# Altium PCB DAP-PCB-REV-3.2.PcbDoc (part 5 of 5)
Units mm, origin at the board's own origin, x right, y up, seen from the top; angles counter-clockwise.
Board outline 54.75 x 54.75 mm, 6 copper layers (L1 (SIG/PWR), L2 (GND), L3 (SIG), L4 (PWR), L5 (GND), L6 (SIG/PWR)), stack 1.65 mm thick; 308 components, 179 nets, 954 pads, 440 vias.
Unrouted connection lines stored in the file: 7.
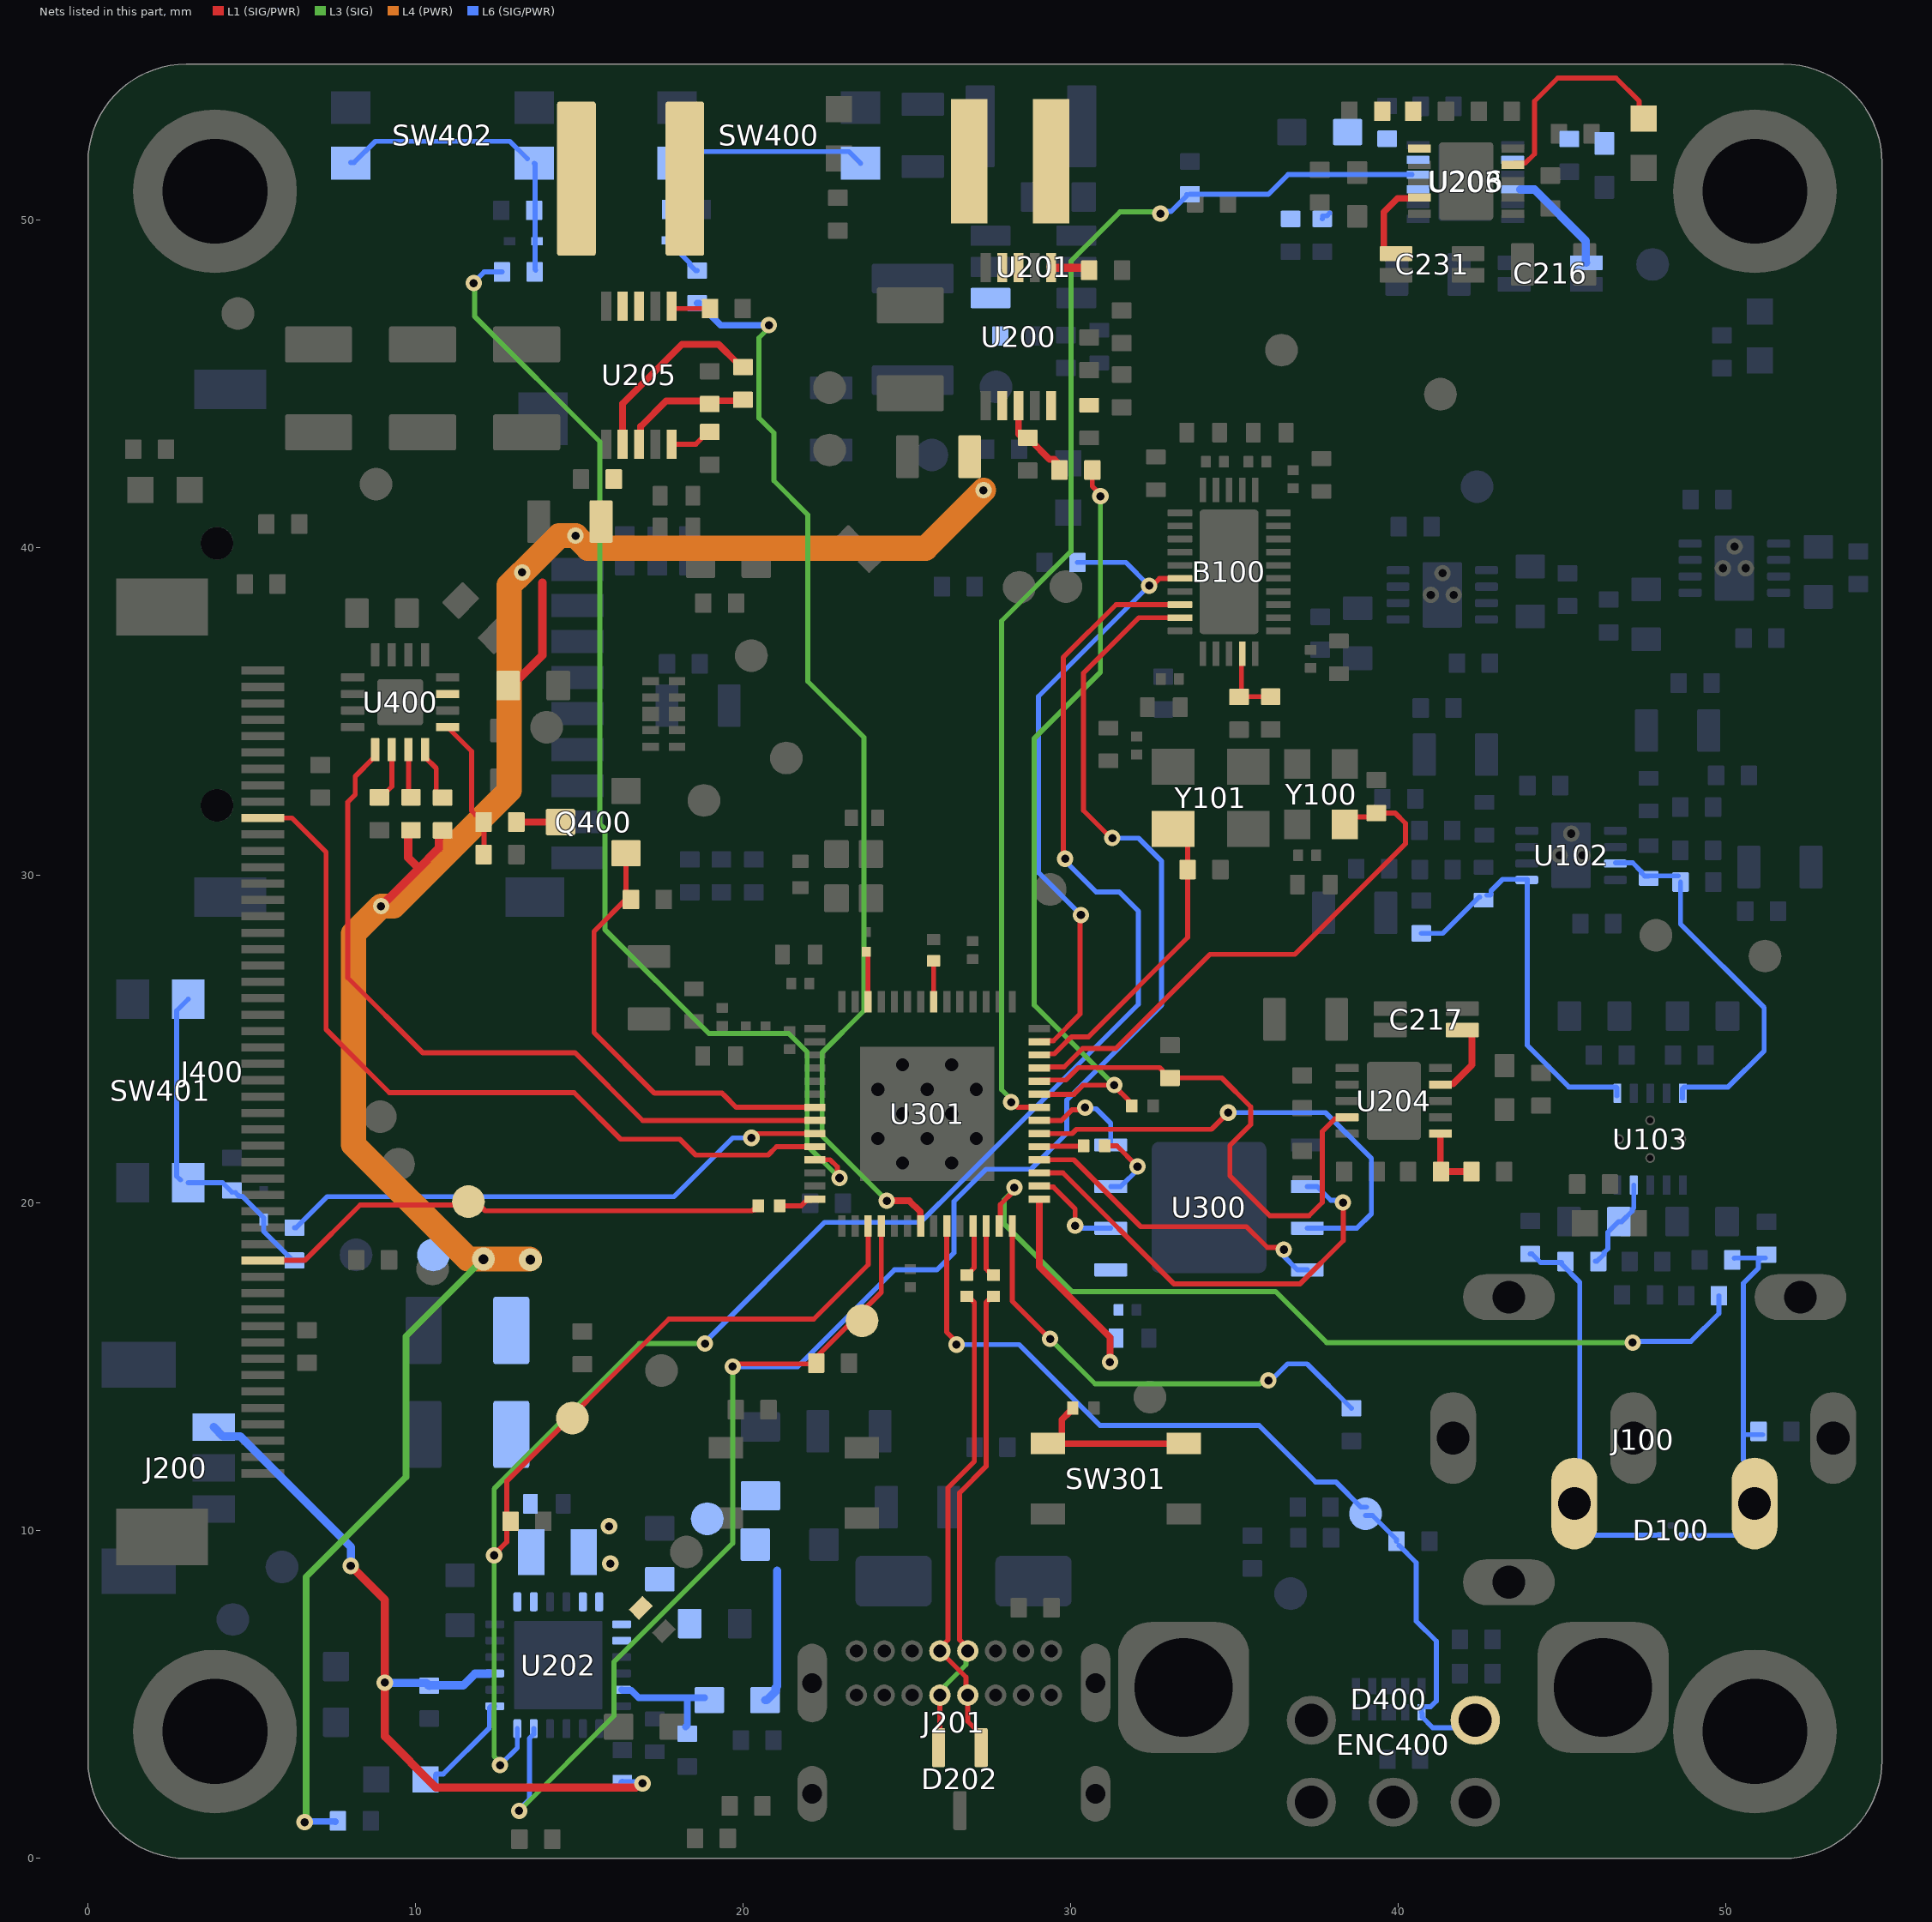
[diagram p7: the nets of this part, all layers, seen from the top]

## Via types
v1: diameter 0.5, hole 0.25, L1 (SIG/PWR) to L6 (SIG/PWR), tented both sides, 357 vias
v2: diameter 0.7, hole 0.35, L1 (SIG/PWR) to L6 (SIG/PWR), tented both sides, 69 vias
v3: diameter 1.25, hole 0.75, L1 (SIG/PWR) to L6 (SIG/PWR), 6 vias
v4: diameter 0.4/0.4/0.4/0.4/0.4/0.4 (per signal layer), hole 0.2, L1 (SIG/PWR) to L6 (SIG/PWR), tented both sides, 5 vias
v5: diameter 0.7, hole 0.3, L1 (SIG/PWR) to L6 (SIG/PWR), tented both sides, 3 vias

## Nets (pads, with @x,y where several pads share a name; then routed paths per layer and width w, separated by ;. In a path a pad name is that pad's centre, name@x,y a point inside that pad or via, vN(x,y) a via of type N, cw(c..) or ccw(c..) an arc to the next point about the centre after c; other vN are vias at no path point) (continued)
NetQ400_1: Q400.1 R425.2 U301.7 | length 13.7
  L1 (SIG/PWR) w0.152: Q400.1@16.422,30.677 16.422,29.416 R425.2@16.573,29.265 ; R425.2@16.496,29.341 15.447,28.292 15.447,25.201 17.295,23.353 19.353,23.353 19.409,23.296 19.784,22.922 22.146,22.922 U301.7@22.153,22.915
NetQ400_3: Q400.3 R423.1 | length 1.5
  L1 (SIG/PWR) w0.203: R423.1@13.052,31.627 14.177,31.627 Q400.3@14.431,31.881
NetR119_1: R119.1 U301.28 | length 14.5
  L1 (SIG/PWR) w0.152: U301.28@28.213,19.297 28.213,17.006 v1(29.366,15.854)
  L3 (SIG) w0.152: v1(29.366,15.854) 30.738,14.482 35.766,14.482 35.804,14.52 35.963,14.52 v1(36.029,14.587)
  L6 (SIG/PWR) w0.152: v1(36.029,14.587) 36.109,14.587 36.614,15.092 37.207,15.092 R119.1@38.561,13.737
NetR128_1: R128.1 U301.27 | length 26.8
  L1 (SIG/PWR) w0.152: U301.27@27.813,19.297 27.847,19.33 27.847,19.955 28.274,20.382 v1(28.274,20.476)
  L3 (SIG) w0.152: v1(28.274,20.476) 28.274,20.413 27.968,20.106 27.968,19.361 30.027,17.301 36.25,17.301 37.808,15.743 v1(47.145,15.743)
  L6 (SIG/PWR) w0.152: v1@47.146,15.777 48.924,15.777 49.78,16.633 R128.1@49.78,17.174
NetR203_1: R203.1 R303.2 U301.37 | length 23.6
  L1 (SIG/PWR) w0.152: U301.37@29.038,23.322 30.094,23.322 30.373,23.601 v1(31.322,23.601) 31.322,23.575 R303.2@31.805,23.093 ; R203.1@30.654,42.371 30.654,41.871 v1@30.814,41.711
  L3 (SIG) w0.152: v1(30.902,41.569) 30.902,36.201 28.884,34.183 28.884,26.039 31.246,23.677 v1@31.271,23.677
NetR204_1: R204.1 U201.4
NetR207_2: R207.2 U200.1 | length 1.3
  L1 (SIG/PWR) w0.254: U200.1@29.401,48.542 30.636,48.542 R207.2@30.636,48.493
NetR219_1: R219.1 R226.2 U203.3 | length 0.3
  L6 (SIG/PWR) w0.152: R219.1@37.672,50.034 R219.1@37.672,50.042 ; R219.1@37.678,50.124 37.812,50.124 R219.1@37.896,50.208
NetR238_1: R238.1 U205.10 | length 1.3
  L1 (SIG/PWR) w0.152: U205.10@17.819,43.16 18.556,43.16 18.91,43.514 R238.1@19.003,43.514
NetR239_2: R239.2 U205.1 | length 1.2
  L1 (SIG/PWR) w0.152: U205.1@17.819,47.374 17.894,47.299 18.978,47.299 R239.2@19.003,47.324
NetR302_2: R302.2 SW301.1 SW301.2 | length 5.6
  L1 (SIG/PWR) w0.203: R302.2@30.052,13.72 30.052,13.715 29.984,13.647 29.979,13.647 29.721,13.389 29.721,12.885 29.498,12.661 SW301.1@29.298,12.661 33.413,12.661 SW301.2@33.43,12.679
NetR304_1: R304.1 U301.25 | length 1.6
  L1 (SIG/PWR) w0.153: R304.1@26.826,17.804 26.851,17.804 26.95,17.903 26.95,17.928 27.049,18.027 27.049,19.046 27.013,19.082 U301.25@27.013,19.297
NetR305_1: R305.1 U301.26 | length 1.6
  L1 (SIG/PWR) w0.153: U301.26@27.413,19.297 27.413,17.992 27.503,17.903 27.54,17.903 R305.1@27.639,17.804
NetR306_1: R306.1 U301.14 | length 1.1
  L1 (SIG/PWR) w0.152: R306.1@21.111,19.918 21.769,19.918 21.94,20.088 22.069,20.088 U301.14@22.102,20.121
NetR409_1: R409.1 U301.9 | length 17
  L1 (SIG/PWR) w0.152: v1@20.304,22.122 U301.9@22.188,22.122
  L6 (SIG/PWR) w0.152: R409.1@6.303,19.249 6.353,19.249 7.301,20.197 17.886,20.197 19.678,21.99 v1(20.25,21.99)
NetR410_1: R410.1 U301.21 | length 33.6
  L1 (SIG/PWR) w0.203: v1@24.383,20.07 25.07,20.07 25.405,19.735 25.405,19.305 U301.21@25.413,19.297
  L3 (SIG) w0.152: v1(20.781,46.791) 20.781,46.706 20.476,46.401 20.476,43.959 20.934,43.501 20.934,42.041 21.972,41.003 21.972,35.923 23.685,34.21 23.685,25.869 22.407,24.591 22.407,22.047 v1(24.383,20.071)
  L6 (SIG/PWR) w0.203: R410.1@18.597,47.459 18.647,47.459 19.315,46.791 v1(20.781,46.791)
NetR411_1: R411.1 U301.11 | length 35.6
  L1 (SIG/PWR) w0.152: U301.11@22.188,21.322 22.654,21.322 22.872,21.103 22.872,20.832 v1(22.939,20.766)
  L3 (SIG) w0.152: v1@11.739,48.112 11.799,48.052 11.799,47.061 15.625,43.235 15.625,31.576 15.777,31.424 15.777,28.35 18.952,25.175 21.389,25.175 21.95,24.615 21.95,21.755 v1(22.939,20.766)
  L6 (SIG/PWR) w0.152: v1@11.739,48.061 12.094,48.416 R411.1@12.636,48.416
  other v1: 11.773,48.073
NetR420_2: R420.2 U400.3 | length 1.6
  L1 (SIG/PWR) w0.152: U400.3@9.783,33.837 9.783,32.44 R420.2@9.91,32.313
NetR421_2: R421.2 U400.4 | length 1.7
  L1 (SIG/PWR) w0.152: U400.4@10.291,33.837 10.291,33.606 10.631,33.267 10.631,32.481 R421.2@10.774,32.338
NetR422_2: R422.2 U400.2 | length 1.6
  L1 (SIG/PWR) w0.152: R422.2@8.945,32.414 8.977,32.414 9.275,32.712 U400.2@9.275,33.837
NetR423_2: R423.2 R424.2 U400.5 | length 4.4
  L1 (SIG/PWR) w0.152: U400.5@10.977,34.523 11.713,33.786 11.713,31.965 11.828,31.851 11.878,31.851 12.052,31.677 R423.2@12.052,31.627 ; R424.2@12.094,30.611 R423.2@12.094,31.627
NetU301_8: U301.8 U400.1 | length 23.1
  L1 (SIG/PWR) w0.152: U400.1@8.716,33.583 8.157,33.024 8.157,32.465 7.929,32.237 7.929,26.877 10.215,24.591 14.863,24.591 16.932,22.522 U301.8@22.188,22.522
OUTS_1: C216.4 U203.10 | length 3.3
  L6 (SIG/PWR) w0.254: U203.10@43.717,50.931 44.149,50.931 45.715,49.365 45.715,48.712 C216.4@45.732,48.696
OUTS_2: C231.4 U206.9 | length 2.4
  L1 (SIG/PWR) w0.203: C231.4@39.552,49.102 39.552,50.245 39.968,50.661 40.618,50.661 U206.9@40.641,50.685
OUTS_3: C217.4 U204.9 | length 2.5
  L1 (SIG/PWR) w0.203: U204.9@41.282,23.618 41.305,23.641 41.666,23.641 42.244,24.219 42.244,25.077 42.121,25.201 C217.4@41.896,25.201
PG_DAC_LDO+: D204.C U206.4 | length 6.8
  L1 (SIG/PWR) w0.152: U206.4@43.491,51.685 43.54,51.734 43.866,51.734 44.149,52.017 44.149,53.623 44.86,54.335 46.638,54.335 47.344,53.629 47.344,53.096 D204.C@47.375,53.065
PG_LDO+: R223.1 U204.4 U301.38 | length 16.1
  L1 (SIG/PWR) w0.152: U301.38@29.038,23.722 29.072,23.755 29.851,23.755 30.23,24.134 32.71,24.134 32.8,24.044 32.8,23.994 32.974,23.82 34.608,23.82 35.488,22.94 35.488,22.394 34.853,21.759 34.853,20.832 36.072,19.613 37.266,19.613 37.672,20.019 37.672,22.184 38.057,22.569 38.383,22.569 U204.4@38.432,22.618
PG_LDO-: R241.1 U203.4 U301.36 | length 39
  L1 (SIG/PWR) w0.152: v1@28.198,23.093 28.369,22.922 U301.36@29.038,22.922
  L3 (SIG) w0.152: v1(28.176,23.08) 28.176,23.174 27.887,23.462 27.887,37.767 30.001,39.882 30.001,48.747 31.5,50.245 v1@32.694,50.245
  L6 (SIG/PWR) w0.152: v1(32.733,50.195) 32.799,50.262 33.059,50.262 33.532,50.735 R241.1@33.532,50.779 ; R241.1@33.634,50.787 36.029,50.787 36.631,51.388 U203.4@40.415,51.388
PGFB_DAC_LDO+: R243.1 R245.2 U206.6 | length 0
  L1 (SIG/PWR) w0.203: R243.1@39.552,53.293 R243.1@39.577,53.319
PGFB_LDO+: R222.1 R228.2 U204.6 | length 2
  L1 (SIG/PWR) w0.203: R228.2@41.282,20.995 U204.6@41.282,22.118 ; R228.2@41.296,20.959 R222.1@42.211,20.959
PGFB_LDO-: R220.1 R224.2 U203.5
PMID_BQ: C200.2 U202.20
POWER_SW: D402.C R401.2 R409.2 SW401.1 SW401.3 | length 10.1
  L6 (SIG/PWR) w0.152: SW401.3@2.823,20.705 2.71,20.819 2.71,25.869 SW401.1@3.064,26.223 ; SW401.3@3.064,20.623 4.108,20.623 R401.2@4.398,20.333 ; R401.2@4.5,20.324 4.615,20.209 4.707,20.209 5.363,19.553 5.363,19.139 6.253,18.249 R409.2@6.303,18.249
RESET: J400.10 U301.10 | length 23.9
  L1 (SIG/PWR) w0.152: J400.10@5.795,31.754 6.227,31.754 7.268,30.713 7.268,25.302 9.199,23.372 14.838,23.372 16.26,21.95 18.068,21.95 18.55,21.467 20.763,21.467 21.018,21.722 U301.10@22.188,21.722
RESETB_DAC: B100.21 R111.2 U301.41 | length 20.1
  L1 (SIG/PWR) w0.152: U301.41@29.038,24.922 29.072,24.955 29.467,24.955 30.281,25.77 v1@30.281,28.757 ; v1(32.389,38.841) 32.483,38.841 32.705,39.063 B100.21@33.329,39.063
  L6 (SIG/PWR) w0.152: R111.2@30.197,39.552 31.678,39.552 v1@32.364,38.866 ; v1(30.306,28.791) 29.011,30.087 29.011,35.462 v1@32.414,38.866
RIGHT_EAR: C124.1 R125.1 U103.9 | length 2.9
  L6 (SIG/PWR) w0.152: R125.1@46.009,18.226 46.057,18.226 46.271,18.44 46.271,18.487 46.391,18.607 46.391,19.111 46.714,19.435 46.814,19.435 47.138,19.759 47.138,19.809 47.181,19.852 U103.9@47.181,20.55
RING: D100.3 J100.3 R117.2 R125.2 | length 11.9
  L6 (SIG/PWR) w0.152: R117.2@44.022,18.452 44.072,18.452 44.334,18.19 R125.2@44.974,18.19 ; R125.2@44.974,18.14 45.533,17.582 J100.3@45.533,10.723 ; J100.3@45.431,10.824 J100.3@45.533,10.723 ; D100.3@47.975,9.862 46.031,9.862 45.533,10.36 J100.3@45.533,10.723
SCL_BQ: B100.23 R208.1 TP200.1 U202.6 U301.17 | length 69.1
  L1 (SIG/PWR) w0.152: v1(12.399,9.25) 12.399,9.272 12.78,9.653 12.78,10.291 12.78,11.51 17.733,16.463 22.153,16.463 23.813,18.124 U301.17@23.813,19.297 ; v1(29.824,30.509) 29.773,30.56 29.773,36.656 31.379,38.263 B100.23@33.329,38.263
  L3 (SIG) w0.152: v1(12.577,2.849) 12.577,2.934 12.399,3.112 12.399,11.282 16.831,15.714 18.736,15.714 v1@18.851,15.828
  L6 (SIG/PWR) w0.152: v1(12.577,2.849) 13.105,3.377 U202.6@13.105,3.962 ; v1@18.876,15.803 22.483,19.41 25.406,19.41 26.614,20.618 32.059,26.063 32.059,28.909 31.475,29.493 30.771,29.493 29.824,30.441 v1(29.824,30.509)
  other v1: 18.831,15.714
SCL_LCD: J400.37 R306.2 TP405.1 | length 16
  L1 (SIG/PWR) w0.152: J400.37@5.338,18.25 6.617,18.25 8.31,19.943 TP405.1@11.612,19.943 ; TP405.1@11.612,20.045 11.663,19.994 11.892,19.994 12.121,19.765 20.273,19.765 20.302,19.794 20.363,19.794 20.461,19.893 R306.2@20.461,19.918
SDA_BQ: B100.24 R211.1 TP202.1 U202.5 U301.18 | length 61
  L1 (SIG/PWR) w0.152: v1@19.664,15.092 22.026,15.092 24.213,17.279 U301.18@24.213,19.297 ; v1@31.221,31.144 30.382,31.983 30.382,36.174 32.072,37.863 B100.24@33.329,37.863
  L3 (SIG) w0.152: v1(13.161,1.452) 16.057,4.347 16.057,5.998 19.679,9.62 19.679,15.132 v1@19.714,15.168
  L6 (SIG/PWR) w0.152: v1(13.161,1.452) 13.161,1.493 13.479,1.811 13.479,3.666 13.605,3.792 U202.5@13.605,3.962 ; v1(19.679,15.01) 21.664,15.01 24.617,17.962 25.912,17.962 26.432,18.482 26.432,20.051 27.416,21.035 28.782,21.035 29.874,22.127 29.874,23.143 32.77,26.039 32.77,30.433 32.065,31.139 v1(31.267,31.139)
SELECT: D400.1 ENC400.5 R412.2 TP402.1 U301.23 | length 27.4
  L1 (SIG/PWR) w0.152: U301.23@26.213,19.297 26.213,16.064 26.508,15.77 v1(26.508,15.681)
  L6 (SIG/PWR) w0.152: v1(26.508,15.681) 28.421,15.681 30.89,13.212 35.742,13.212 37.462,11.492 38.085,11.492 38.854,10.723 TP402.1@39.018,10.723 ; TP402.1@38.993,10.469 39.203,10.469 39.941,9.731 R412.2@39.941,9.681 ; R412.2@40.018,9.554 40.542,9.03 40.542,7.243 41.152,6.633 41.152,4.805 40.977,4.629 40.753,4.629 40.704,4.58 D400.1@40.704,4.455 ; D400.1@40.72,4.424 40.72,4.314 41.043,3.992 42.113,3.992 ENC400.5@42.342,4.22
SET_LDO-: C222.2 R232.2 U203.8
SHDN_BB_3.3: C230.2 R237.2 U205.8 | length 4
  L1 (SIG/PWR) w0.203: U205.8@16.819,43.16 16.87,43.211 16.87,43.703 17.646,44.479 C230.2@19.105,44.479 ; C230.2@19.105,44.487 19.95,44.487 R237.2@19.968,44.505
SHDN_BB_3.9: C213.2 R203.2 U200.8 | length 2.4
  L1 (SIG/PWR) w0.203: U200.8@28.401,44.328 28.401,43.471 28.561,43.311 C213.2@28.681,43.311 ; C213.2@28.681,43.279 28.768,43.279 29.35,42.697 29.498,42.697 R203.2@29.595,42.6
SPI_CS0: U300.1 U301.32 | length 9.7
  L1 (SIG/PWR) w0.152: U301.32@29.038,21.322 30.09,21.322 32.129,19.283 35.361,19.283 35.996,18.647 36.432,18.647 v1(36.499,18.58)
  L6 (SIG/PWR) w0.152: v1@36.478,18.546 36.478,18.401 36.918,17.962 U300.1@37.218,17.962
SPI_D: U300.5 U301.35 | length 3.2
  L1 (SIG/PWR) w0.152: U301.35@29.038,22.522 29.71,22.522 30.036,22.848 30.367,22.848 v1(30.434,22.914)
  L6 (SIG/PWR) w0.152: v1(30.434,22.914) 30.468,22.88 30.772,22.88 31.218,22.435 U300.5@31.218,21.772
SPI_HD: U300.7 U301.30 | length 3
  L1 (SIG/PWR) w0.152: U301.30@29.038,20.522 29.072,20.488 29.467,20.488 30.129,19.826 30.129,19.359 v1@30.103,19.333
  L6 (SIG/PWR) w0.152: v1@30.128,19.283 30.179,19.232 U300.7@31.218,19.232
  other v1: 30.129,19.312
SPI_Q: U300.2 U301.34 | length 14.9
  L1 (SIG/PWR) w0.152: U301.34@29.038,22.122 30.041,22.122 30.169,22.249 34.289,22.249 v1@34.853,22.813
  L6 (SIG/PWR) w0.152: v1@34.802,22.788 34.827,22.762 37.774,22.762 39.171,21.365 39.171,19.675 38.728,19.232 U300.2@37.218,19.232
  other v1: 34.802,22.762
SPI_WP: U300.3 U301.31 | length 13.7
  L1 (SIG/PWR) w0.152: U301.31@29.038,20.922 29.759,20.922 33.151,17.53 36.986,17.53 38.313,18.857 38.313,20.013 v1(38.307,20.019)
  L6 (SIG/PWR) w0.152: U300.3@37.218,20.502 37.518,20.502 37.934,20.086 38.241,20.086 v1(38.307,20.019)
SPICLK: R308.2 U301.33 | length 1.4
  L1 (SIG/PWR) w0.152: U301.33@29.038,21.722 29.051,21.734 30.421,21.734 R308.2@30.433,21.746
SPICLK_FL: R308.1 U300.6 | length 2.3
  L1 (SIG/PWR) w0.152: R308.1@31.038,21.746 31.403,21.746 32.008,21.142 v1@32.008,21.137
  L6 (SIG/PWR) w0.152: U300.6@31.218,20.502 31.518,20.502 v1@32.059,21.043
  other v1: 32.034,21.116
STAT_BQ: D200.C U202.7 | length 3.3
  L6 (SIG/PWR) w0.152: D200.C@10.603,2.334 10.603,2.55 10.628,2.575 10.844,2.575 12.254,3.986 12.254,4.603 12.298,4.647 U202.7@12.42,4.647
SUMM_L: C123.1 R115.2 U102.7 U103.5 | length 11.6
  L6 (SIG/PWR) w0.152: U102.7@46.627,30.382 47.148,30.382 47.411,30.119 47.411,30.082 47.517,29.976 C123.1@47.629,29.976 ; C123.1@47.635,29.983 R115.2@48.537,29.983 ; R115.2@48.608,29.798 48.608,28.516 51.16,25.964 51.16,24.642 50.061,23.544 48.725,23.544 48.67,23.489 U103.5@48.67,23.194
SUMM_R: C118.1 R114.2 U102.1 U103.1 | length 12.3
  L6 (SIG/PWR) w0.152: R114.2@40.695,28.231 41.351,28.231 42.461,29.341 C118.1@42.473,29.341 ; C118.1@42.693,29.399 42.801,29.399 42.824,29.421 42.824,29.529 43.177,29.882 43.927,29.882 43.927,24.814 45.197,23.544 46.637,23.544 46.664,23.517 U103.1@46.664,23.27
SW1_BB_3.3: L204.1 U205.3
SW1_BB_3.9: L200.1 U200.3
SW2_BB_3.3: L204.2 U205.4
SW2_BB_3.9: L200.2 U200.4
SW_BQ: C207.1 L203.1 U202.17 U202.18
  other v1: 15.944,8.996 15.904,10.139
SYS: C203.2 C208.2 C209.2 C210.2 C224.2 C234.2 C412.2 L203.2 R206.2 R237.1 R420.1 R421.1 TP204.1 U200.7 U202.13 U202.14 U205.7 U400.7 | length 76.5
  L1 (SIG/PWR) w0.203: U205.7@16.319,43.16 16.319,44.398 18.128,46.207 19.25,46.207 19.809,45.648 R237.1@20.045,45.648
  L1 (SIG/PWR) w0.254: v1(8.945,29.062) 10.05,30.167 ; R420.1@9.91,31.348 9.865,31.348 9.775,31.258 9.775,30.543 10.05,30.268 10.05,30.167 ; R421.1@10.824,31.373 10.708,31.256 10.708,30.825 10.05,30.167 ; C412.2@12.844,35.743 13.116,36.015 13.167,36.015 13.872,36.72 13.872,38.934
  L3 (SIG) w0.203: v1(6.614,1.107) 6.656,1.149 6.656,8.587 9.707,11.637 9.707,15.93 11.942,18.165 v5@11.942,18.292
  L4 (PWR) w0.762: v1(13.252,39.246) 12.856,38.85 12.856,32.592 9.326,29.062 v1(8.945,29.062) 8.107,28.223 8.107,21.783 11.597,18.292 v5(12.069,18.292) v5@13.482,18.292 ; v1@13.262,39.246 14.38,40.365 v1(14.883,40.365) 15.264,39.984 25.563,39.984 v1(27.332,41.753)
  L6 (SIG/PWR) w0.203: v1(6.614,1.107) 6.634,1.127 7.543,1.127 R206.2@7.548,1.122
  other v5: 13.503,18.27
TIP: D100.2 J100.2 R127.2 R129.2 R134.2 | length 12.7
  L6 (SIG/PWR) w0.152: D100.2@48.651,9.859 50.328,9.859 50.931,10.462 50.931,10.824 J100.2@51.075,10.968 ; R127.2@50.249,18.317 50.257,18.325 50.987,18.325 51.197,18.325 51.059,18.325 50.987,18.253 50.987,18.017 50.525,17.555 50.525,12.882 ; J100.2@51.033,11.652 50.525,12.16 50.525,12.882 ; J100.2@51.075,10.821 J100.2@51.075,10.968 ; J100.2@51.075,11.652 J100.2@51.075,10.968 ; R129.2@51.117,12.933 50.575,12.933 50.525,12.882
TRI_STATE_22: R106.2 U301.39 Y100.1 | length 16.5
  L1 (SIG/PWR) w0.152: U301.39@29.038,24.122 29.072,24.155 29.794,24.155 30.357,24.718 31.373,24.718 34.243,27.588 36.834,27.588 40.212,30.967 40.212,31.589 39.894,31.906 R106.2@39.552,31.906 ; Y100.1@38.36,31.551 38.597,31.788 39.204,31.788 R106.2@39.323,31.906
TRI_STATE_24: R107.2 U301.40 Y101.1 | length 9.3
  L1 (SIG/PWR) w0.152: U301.40@29.038,24.522 29.072,24.555 29.496,24.555 30.014,25.074 30.535,25.074 33.565,28.104 33.565,29.959 R107.2@33.684,30.078 ; Y101.1@33.118,31.414 33.565,30.967 R107.2@33.565,30.298
TS: J200.3 R214.1 R215.2 U202.9 | length 24.4
  L1 (SIG/PWR) w0.254: v1(8.02,8.93) 9.061,7.888 9.061,5.399 v1@9.072,5.389 ; v1(9.061,5.366) 9.061,3.723 10.621,2.163 16.732,2.163 16.858,2.289 v1(16.924,2.289)
  L6 (SIG/PWR) w0.254: J200.3@3.841,13.167 4.127,12.881 4.653,12.881 8.03,9.504 v1@8.03,8.97 ; v1@9.072,5.355 10.334,5.355 R215.2@10.418,5.271 ; R215.2@10.385,5.287 11.459,5.287 11.812,5.64 U202.9@12.257,5.64 ; R214.1@16.311,2.306 16.319,2.297 16.916,2.297 v1(16.924,2.289)
U0TXD: R307.1 U301.49 | length 1.2
  L1 (SIG/PWR) w0.152: R307.1@25.81,27.334 25.812,27.333 25.812,26.148 U301.49@25.813,26.147
USB_D_N: D202.1 J201.A7 J201.B7 R304.2 | length 14.4
  L1 (SIG/PWR) w0.153: R304.2@26.826,17.154 26.925,17.056 26.965,17.056 27.055,16.966 27.055,12.115 26.251,11.311 26.251,6.67 26.004,6.423 J201.A7@26.004,6.332 26.8,5.536 26.8,5.154 J201.B7@26.924,5.029 ; J201.B7@26.854,4.982 26.854,4.186 27.178,3.862 D202.1@27.178,3.785
USB_D_P: D202.2 J201.A6 J201.B6 R305.2 | length 14.4
  L1 (SIG/PWR) w0.153: D202.2@25.875,3.789 25.891,3.789 26.004,3.901 J201.B6@26.004,4.982 ; J201.A6@26.854,6.332 26.854,6.423 26.607,6.67 26.607,11.163 27.411,11.967 27.411,16.966 27.5,17.056 27.541,17.056 R305.2@27.639,17.154
  L3 (SIG) w0.153: J201.B6@26.004,4.982 26.004,5.055 26.16,5.212 26.16,5.27 26.802,5.911 26.802,6.279 J201.A6@26.873,6.35
VC_BB_3.9: C212.2 U200.10
VDD_SPI: C311.2 C312.2 U300.8 U301.29 | length 5.9
  L1 (SIG/PWR) w0.203: U301.29@29.038,20.122 29.038,18.061 31.196,15.904 v1(31.196,15.147)
VDPM_BQ: R202.1 R205.2 U202.23 | length 3.5
  L6 (SIG/PWR) w0.203: U202.23@16.29,5.147 16.308,5.128 16.585,5.128 16.808,4.906 18.292,4.906 R202.1@18.825,4.906 ; R205.2@18.241,4.017 18.292,4.068 18.292,4.838
VOLUME+_SW: D403.C R404.2 R410.2 SW400.1 SW400.3 | length 9.2
  L6 (SIG/PWR) w0.152: D403.C@17.714,49.342 18.373,48.683 18.373,48.633 18.547,48.459 R410.2@18.597,48.459 ; 17.767,49.512 R404.2@17.767,50.321 ; R404.2@17.809,50.347 17.809,51.56 SW400.3@17.981,51.732 ; SW400.3@18.063,52.074 18.075,52.086 23.227,52.086 SW400.1@23.581,51.732
VOLUME-_SW: D404.C R406.2 R411.2 SW402.1 SW402.3 | length 9.2
  L6 (SIG/PWR) w0.152: SW402.3@8.024,51.757 8.124,51.757 8.771,52.404 12.878,52.404 13.411,51.871 SW402.1@13.415,51.871 ; SW402.1@13.624,51.732 13.644,51.713 13.644,50.296 13.644,49.382 13.644,48.493 R411.2@13.669,48.467
VUSB: C202.2 FB200.2 R202.2 R227.2 TP201.1 U202.19 | length 4.1
  L6 (SIG/PWR) w0.254: R202.2@20.666,4.83 20.716,4.83 20.989,5.103 20.989,5.206 21.035,5.252 21.035,8.778
XI: B100.29 R104.2 R105.1 | length 2
  L1 (SIG/PWR) w0.152: R105.1@35.132,35.446 35.208,35.523 B100.29@35.208,36.555 ; R105.1@35.208,35.454 R104.2@36.097,35.454
XTAL_P: L301.2 U301.54 | length 1.3
  L1 (SIG/PWR) w0.152: U301.54@23.804,26.369 23.809,26.374 23.809,27.665 L301.2@23.804,27.669
pads on no net: B100.4 B100.5 B100.6 B100.7 B100.26 B100.28 D400.4 D400.6 D400.7 D400.9 D400.10 D401.6 D401.7 D401.9 D401.10 ENC400.6 ENC400.7 J100.5 J201.A8 J201.B8 J400.33 J400.39 J400.44 J400.45 J400.46 J400.47 J400.S1 J400.S2 J401. U203.7 U301.1 U301.51 U301.52
copper on no net:
  other v3: 0.839,23.423 3.589,23.423 10.824,51.207 20.781,51.207 10.824,53.957 20.781,53.957

## Polygon pours and split planes (outlines as drawn)
GND on L1 (SIG/PWR) "L1 (SIG/PWR)-GND" (solid, pour order 210): 51.49,0.004 ccw(c51.715,3.045) 54.764,3 24.211,3 23.905,3.306 23.905,9.529 24.337,9.961 24.337,11.307 19.181,11.307 18.292,12.196 18.285,12.196 18.285,15.777 19.549,17.06 20.578,18.089 20.578,35.735 20.807,35.964 20.807,35.437 21.442,34.802 25.76,34.802 26.547,35.589 26.547,38.917 27.969,40.339 27.969,41 25.843,41 26.429,41.586 54.741,41.586 54.741,51.767 ccw(c51.754,51.767) 51.754,54.754 3,54.754 ccw(c2.999,51.755) 0,51.755 0,3.027 ccw(c3.026,3.026) 3.027,0 26.195,0 26.191,0.004
GND on L1 (SIG/PWR) "NONET_L06_P-001" (solid, pour order 202): 21.645,25.074 21.645,28.3 19.74,28.3 19.74,26.395 20.019,26.115 21.061,26.115 21.061,25.074
+3V3_DIG on L1 (SIG/PWR) "NONET_L06_P-001" (solid, pour order 183): 16.336,26.699 17.911,26.699 17.911,26.039 18.571,26.039 19.054,25.556 20.248,25.556 20.248,25.15 16.336,25.15
GND on L1 (SIG/PWR) "NONET_L06_P-001" (solid, pour order 190): 36.859,36.478 36.859,35.208 37.012,35.056 37.596,35.056 38.485,35.945 38.485,36.478 37.469,36.478
GND on L1 (SIG/PWR) "NONET_L06_P-001" (solid, pour order 199): 27.195,27.835 27.195,28.825 26.84,28.825 26.84,27.835 26.992,27.835
FB_BB_3.3 on L1 (SIG/PWR) "FB_BB_3.3_L01_P017" (solid, pour order 17): 18.47,37.977 17.174,39.272 17.174,43.616 17.454,43.59 17.454,42.473 17.809,42.117 17.809,40.466 17.911,40.365 17.911,39.984 19.283,39.984 19.283,37.977
+3V3_DIG on L1 (SIG/PWR) "NONET_L06_P-001" (solid, pour order 196): 23.524,25.836 23.524,26.801 22.178,28.147 21.873,28.147 21.873,27.106 21.873,25.836
+3V3_DIG on L1 (SIG/PWR) "+3V3_DIG_L01_P072" (solid, pour order 72): 27.131,27.258 27.182,27.258 27.182,27.588 26.826,27.588 26.826,27.258 26.901,27.258 26.901,25.812 27.131,25.812
+3V3_DIG on L1 (SIG/PWR) "+3V3_DIG_L01_P127" (solid, pour order 127): 25.125,19.613 25.125,18.317 25.277,18.165 25.277,17.809 24.896,17.809 24.896,18.546 24.896,19.613 25.074,19.613
GND on L1 (SIG/PWR) "NONET_L06_P-001" (solid, pour order 155): 25.277,16.59 25.277,17.581 24.921,17.581 24.921,16.59 25.074,16.59
NetC302_2 on L1 (SIG/PWR) "NONET_L06_P-001" (solid, pour order 180): 20.908,24.82 20.908,25.709 20.527,25.709 20.527,24.413 22.508,24.413 22.508,25.023 21.873,25.023 21.67,24.82
+3V3_DAC on L1 (SIG/PWR) "NONET_L06_P-001" (solid, pour order 195): 35.945,40.974 35.945,41.279 36.631,41.965 38.002,41.965 38.002,40.974 36.682,40.974
+LED on L1 (SIG/PWR) "+LED_L01_P036" (solid, pour order 36): 10.612,35.158 14.626,35.158 14.626,33.989 12.365,33.989 11.451,34.904 10.612,34.904
+3V3_DIG on L1 (SIG/PWR) "NONET_L06_P-001" (solid, pour order 193): 34.934,41.395 34.934,43.986 34.07,43.986 34.07,43.122 34.223,43.122 34.502,42.843 34.502,42.36 34.731,42.36 34.731,41.395 34.807,41.395
+3V3_DAC on L1 (SIG/PWR) "NONET_L06_P-001" (solid, pour order 192): 35.132,41.381 35.132,43.971 35.996,43.971 35.996,43.108 35.843,43.108 35.564,42.828 35.564,42.346 35.335,42.346 35.335,41.381 35.259,41.381
+3V3_ANALOG on L1 (SIG/PWR) "NONET_L06_P-001" (solid, pour order 189): 36.504,32.008 36.504,28.782 37.139,28.782 37.139,31.094 37.291,31.094 37.291,32.008 36.961,32.008
GND on L1 (SIG/PWR) "NONET_L06_P-001" (solid, pour order 188): 32.897,34.65 32.897,34.04 30.738,34.04 30.738,35.564 31.195,35.564 32.11,34.65
GND on L1 (SIG/PWR) "NONET_L06_P-001" (solid, pour order 187): 32.897,36.224 32.897,34.777 32.186,34.777 31.119,35.843 31.119,36.224
+3V3_ANALOG on L1 (SIG/PWR) "NONET_L06_P-001" (solid, pour order 186): 33.761,33.862 33.761,32.77 30.738,32.77 30.738,33.862 33.608,33.862
+3V3_DAC on L1 (SIG/PWR) "NONET_L06_P-001" (solid, pour order 185): 33.126,36.199 33.126,34.827 34.523,34.827 34.523,37.139 34.319,37.139 34.319,36.199
+3V3_DAC on L1 (SIG/PWR) "NONET_L06_P-001" (solid, pour order 184): 35.945,37.571 35.945,36.682 38.485,36.682 38.485,37.571 36.555,37.571
PGFB_DAC_LDO+ on L1 (SIG/PWR) "NONET_L06_P-001" (solid, pour order 154): 41,52.049 41,53.75 39.222,53.75 39.222,52.049 40.492,52.049
ILIM_DAC_LDO+ on L1 (SIG/PWR) "NONET_L06_P-001" (solid, pour order 153): 43.133,53.827 43.133,52.049 43.844,52.049 43.844,53.827
EN_DAC_LDO+ on L1 (SIG/PWR) "EN_DAC_LDO+_L01_P152" (solid, pour order 152): 43.139,51.069 44.917,51.069 45.425,51.577 45.425,53.151 44.485,53.151 44.485,51.958 43.85,51.323 43.139,51.323
+3V9 on L1 (SIG/PWR) "NONET_L06_P-001" (solid, pour order 150): 43.133,50.804 43.133,49.737 44.429,49.737 44.429,46.054 46.486,46.054 46.486,50.804
+3V3_DAC on L1 (SIG/PWR) "NONET_L06_P-001" (solid, pour order 149): 40.136,50.321 39.831,50.017 39.831,49.382 40.619,49.382 40.619,48.543 39.425,48.543 39.425,48.086 41.381,48.086 41.381,50.321
NetC231_1 on L1 (SIG/PWR) "NONET_L06_P-001" (solid, pour order 148): 37.215,50.804 37.215,47.172 42.676,47.172 42.676,48.569 41.584,48.569 41.584,47.908 39.222,47.908 39.222,50.804 38.358,50.804
NetC233_1 on L1 (SIG/PWR) "NETC233_1_L01_P147" (solid, pour order 147): 41.006,51.822 37.209,51.822 37.209,50.982 39.708,50.982 40.295,51.568 41.006,51.568
+3V3_ANALOG on L1 (SIG/PWR) "NONET_L06_P-001" (solid, pour order 132): 40.415,24.007 41.609,24.007 41.965,24.363 41.965,24.794 41.254,24.794 41.254,25.683 42.447,25.683 42.447,26.268 40.415,26.268
GND on L1 (SIG/PWR) "NONET_L06_P-001" (solid, pour order 144): 40.709,20.603 39.044,20.603 39.044,24.794 37.393,24.794 37.393,27.207 38.714,27.207 38.917,27.004 38.917,25.506 40.238,25.506 40.238,24.312 40.669,24.312
ILIM_LDO+ on L1 (SIG/PWR) "NONET_L06_P-001" (solid, pour order 145): 38.079,22.254 38.079,20.629 38.79,20.629 38.79,22.254
+3V9 on L1 (SIG/PWR) "NONET_L06_P-001" (solid, pour order 143): 38.79,23.499 35.488,23.499 35.488,27.207 37.215,27.207 37.215,24.617 38.79,24.617 38.79,23.88
NetC217_1 on L1 (SIG/PWR) "NONET_L06_P-001" (solid, pour order 142): 44.733,23.702 42.625,23.702 42.625,26.445 40.238,26.445 40.238,25.709 39.095,25.709 39.095,27.233 44.733,27.233
SYS on L1 (SIG/PWR) "SYS_L01_P120" (solid, pour order 120): 15.244,40.746 14.609,40.746 14.304,40.441 14.304,39.958 12.831,39.958 12.831,38.942 16.489,38.942 16.489,43.59 16.158,43.59 16.158,42.422 15.244,42.422
BOOT_BQ on L1 (SIG/PWR) "BOOT_BQ_L01_P118" (solid, pour order 118): 17.479,7.472 17.098,7.091 17.098,6.532 18.114,5.516 19.232,5.516 19.232,6.227 17.987,7.472
SW_BQ on L1 (SIG/PWR) "SW_BQ_L01_P117" (solid, pour order 117): 16.59,7.243 15.473,8.361 15.473,10.596 16.158,10.596 17.301,9.453 17.301,7.675 16.87,7.243
+3V9 on L1 (SIG/PWR) "+3V9_L01_P021" (solid, pour order 21): 21.162,48.493 22.508,48.493 22.508,46.283 27.563,46.283 27.563,43.87 21.162,43.87
DVDD on L1 (SIG/PWR) "DVDD_L01_P097" (solid, pour order 97): 32.287,41.381 34.142,41.381 34.142,42.143 32.287,42.143
SW2_BB_3.9 on L1 (SIG/PWR) "SW2_BB_3.9_L01_P019" (solid, pour order 19): 28.056,48.099 27.751,48.099 27.751,49.141 27.09,49.801 25.287,49.801 25.287,53.877 27.842,53.877 27.842,49.913 28.056,49.699
SW1_BB_3.9 on L1 (SIG/PWR) "SW1_BB_3.9_L01_P020" (solid, pour order 20): 28.249,48.061 28.554,48.061 28.554,49.153 29.163,49.763 31.017,49.763 31.017,53.877 28.554,53.877 28.554,49.966 28.249,49.661
SYS on L1 (SIG/PWR) "SYS_L01_P022" (solid, pour order 22): 28.049,41.355 28.049,44.782 27.745,44.782 27.745,43.715 27.694,43.665 26.547,43.665 26.547,41.355
VC_BB_3.9 on L1 (SIG/PWR) "VC_BB_3.9_L01_P023" (solid, pour order 23): 30.865,44.784 29.239,44.784 29.239,43.87 30.865,43.87
NetC212_1 on L1 (SIG/PWR) "NETC212_1_L01_P024" (solid, pour order 24): 31.195,44.53 31.195,43.921 30.916,43.641 30.23,43.641 30.23,43.133 31.856,43.133 31.856,44.53
FB_BB_3.9 on L1 (SIG/PWR) "FB_BB_3.9_L01_P080" (solid, pour order 80): 31.856,44.987 31.856,46.486 31.17,46.486 31.17,46.156 30.763,45.749 30.078,45.749 30.078,44.987
NetC226_2 on L1 (SIG/PWR) "NETC226_2_L01_P016" (solid, pour order 16): 19.257,42.778 18.165,42.778 18.165,41.279 19.283,41.279 19.283,42.752
SW1_BB_3.3 on L1 (SIG/PWR) "SW1_BB_3.3_L01_P015" (solid, pour order 15): 16.653,46.909 16.958,46.909 16.958,47.951 17.619,48.611 19.422,48.611 19.422,53.767 17.746,53.767 17.263,53.285 17.263,49.119 16.653,48.51
SW2_BB_3.3 on L1 (SIG/PWR) "SW2_BB_3.3_L01_P014" (solid, pour order 14): 16.463,46.943 16.158,46.943 16.158,47.985 15.498,48.645 13.695,48.645 13.695,53.801 15.371,53.801 15.854,53.319 15.854,49.153 16.463,48.543
+3V3_DIG on L1 (SIG/PWR) "+3V3_DIG_L01_P011" (solid, pour order 11): 10.418,42.676 10.418,41.355 5.541,41.355 5.541,44.81 15.981,44.81 15.981,42.676 12.933,42.676
+3V3_DIG on L1 (SIG/PWR) "+3V3_DIG_L01_P077" (solid, pour order 77): 4.398,33.38 4.398,32.643 6.379,32.643 6.379,33.38 4.576,33.38
+3V3_DIG on L1 (SIG/PWR) "+3V3_DIG_L01_P078" (solid, pour order 78): 4.449,16.895 4.449,15.65 7.726,15.65 7.726,16.895 4.5,16.895
EN_LDO+ on L1 (SIG/PWR) "EN_LDO+_L01_P065" (solid, pour order 65): 38.79,23.245 36.834,23.245 36.504,22.915 36.504,21.162 37.414,21.162 37.414,22.327 38.079,22.991 38.79,22.991
NetC223_1 on L1 (SIG/PWR) "NETC223_1_L01_P064" (solid, pour order 64): 40.936,22.483 44.733,22.483 44.733,23.22 42.13,23.22 41.647,22.737 40.936,22.737
+LED on L1 (SIG/PWR) "+LED_L01_P037" (solid, pour order 37): 5.363,40.06 5.363,36.097 6.075,36.097 6.075,40.06
SYS on L1 (SIG/PWR) "SYS_L01_P035" (solid, pour order 35): 11.815,35.666 12.298,36.148 13.187,36.148 13.187,35.335 11.536,35.335 11.459,35.412 10.621,35.412 10.621,35.666
NetC410_2 on L1 (SIG/PWR) "NETC410_2_L01_P034" (solid, pour order 34): 10.164,36.377 10.418,36.377 10.418,36.859 11.942,38.383 11.917,38.383 11.307,38.993 10.494,38.18 10.494,37.418 10.164,37.088
NetC410_1 on L1 (SIG/PWR) "NETC410_1_L01_P033" (solid, pour order 33): 10.621,35.92 11.739,35.92 13.06,37.24 12.425,37.875 12.323,37.875 10.621,36.174
NetC411_1 on L1 (SIG/PWR) "NETC411_1_L01_P032" (solid, pour order 32): 9.148,36.377 9.148,37.19 8.843,37.494 7.624,37.494 7.624,38.51 8.869,38.51 8.869,37.825 9.402,37.291 9.402,36.377
NetC411_2 on L1 (SIG/PWR) "NETC411_2_L01_P031" (solid, pour order 31): 9.91,36.377 9.91,37.19 10.24,37.52 10.24,38.536 9.097,38.536 9.097,37.85 9.656,37.291 9.656,36.377
no net on Top Overlay "NONET_L06_P-001" (solid): 24.495,15.235 ccw(c24.495,14.735) 23.995,14.735 23.995,14.669 ccw(c24.53,14.703) 24.495,14.169 ccw(c23.979,14.702)
no net on Top Overlay "NONET_L06_P-001" (solid): 30.594,8.906 ccw(c30.594,8.406) 30.094,8.406 30.094,8.34 ccw(c30.629,8.374) 30.594,7.84 ccw(c30.078,8.373)
no net on Top Overlay "NONET_L06_P-001" (solid): 7.583,40.716 ccw(c7.583,40.216) 7.083,40.216 7.083,40.149 ccw(c7.617,40.184) 7.583,39.649 ccw(c7.066,40.183)
no net on Top Overlay "NONET_L06_P-001" (solid): 44.576,26.936 ccw(c44.576,26.436) 44.076,26.436 44.076,26.369 ccw(c44.611,26.404) 44.576,25.869 ccw(c44.059,26.402)
no net on Top Overlay "NONET_L06_P-001" (solid): 20.783,43.088 ccw(c21.283,43.088) 21.283,42.588 21.35,42.588 ccw(c21.315,43.123) 21.85,43.088 ccw(c21.317,42.571)
no net on Top Overlay "NONET_L06_P-001" (solid): 7.301,49.364 ccw(c7.301,48.864) 6.801,48.864 6.801,48.797 ccw(c7.335,48.832) 7.301,48.297 ccw(c6.784,48.831)
no net on Top Overlay "NONET_L06_P-001" (solid): 29.995,40.769 ccw(c29.995,40.269) 29.495,40.269 29.495,40.203 ccw(c30.03,40.237) 29.995,39.703 ccw(c29.479,40.236)
no net on Top Overlay "NONET_L06_P-001" (solid): 44.705,47.231 ccw(c44.705,46.731) 44.205,46.731 44.205,46.664 ccw(c44.74,46.699) 44.705,46.164 ccw(c44.188,46.697)
no net on Top Overlay "NONET_L06_P-001" (solid): 25.66,30.052 ccw(c25.66,29.552) 25.161,29.552 25.161,29.485 ccw(c25.695,29.52) 25.661,28.985 ccw(c25.144,29.519)
GND on L6 (SIG/PWR) "L6 (SIG/PWR)-GND" (solid, pour order 201): 51.697,-0.011 51.743,-0.011 ccw(c51.743,3) 54.754,3 52.108,3 44.633,3 44.022,3.611 41.05,6.583 41.05,9.224 31.17,9.224 28.935,11.459 26.877,11.459 26.166,12.171 26.166,13.923 23.118,13.923 23.118,11.967 25.404,11.967 25.404,10.088 25.836,9.656 26.344,9.656 26.344,6.837 28.935,6.837 28.935,2.925 27.893,2.925 27.219,2.265 24.82,2.265 23.753,3.331 23.753,6.583 21.34,6.583 21.327,5.757 18.876,8.208 18.876,33.487 22.882,37.367 35.589,37.367 35.894,37.672 35.894,39.323 36.656,40.111 40.949,44.403 43.235,44.403 43.235,42.295 43.413,42.117 44.454,42.117 45.775,43.438 45.775,44.396 54.741,44.403 54.741,51.767 ccw(c51.754,51.767) 51.754,54.754 3,54.754 ccw(c3,51.754) 0,51.754 0,3.027 ccw(c3.027,3.027) 3.015,0 51.697,0
GND on L6 (SIG/PWR) "NONET_L06_P-001" (solid, pour order 205): 23.474,24.972 23.474,20.68 27.639,20.68 27.639,24.972 24.286,24.972
GND on L6 (SIG/PWR) "NONET_L06_P-001" (solid, pour order 203): 31.856,17.2 31.856,15.447 33.608,15.447 33.608,17.2
GND on L6 (SIG/PWR) "NONET_L06_P-001" (solid, pour order 200): 37.723,21.975 35.666,21.975 35.666,21.365 37.723,21.365
VDD_SPI on L6 (SIG/PWR) "VDD_SPI_L06_P128" (solid, pour order 128): 31.652,18.114 31.652,14.812 30.713,14.812 30.713,18.114
+3V3_DIG on L6 (SIG/PWR) "NONET_L06_P-001" (solid, pour order 198): 18.063,29.747 18.063,28.198 20.603,28.198 20.603,29.747
+3V3_DIG on L6 (SIG/PWR) "NONET_L06_P-001" (solid, pour order 197): 18.114,36.91 18.114,34.853 17.251,34.853 17.251,35.691 14.126,35.691 14.126,36.377 15.701,36.377 16.235,36.91
GND on L6 (SIG/PWR) "NONET_L06_P-001" (solid, pour order 169): 39.476,4.195 39.476,6.659 39.933,6.659 39.933,4.195
+3V3_ANALOG on L6 (SIG/PWR) "+3V3_ANALOG_L06_P056" (solid, pour order 56): 51.109,38.785 51.109,36.758 51.947,36.758 51.947,38.785
PGFB_LDO- on L6 (SIG/PWR) "NONET_L06_P-001" (solid, pour order 161): 40.949,51.693 38.612,51.693 38.002,52.303 38.002,53.217 38.968,53.217 39.45,52.734 40.009,52.734 40.009,51.972 40.949,51.972
-3V3 on L6 (SIG/PWR) "L6 (SIG/PWR)--3V3" (solid, pour order 167): 40.822,39.171 40.822,39.526 40.492,39.526 40.492,40.974 39.704,40.974 39.704,39.171
NetR219_1 on L6 (SIG/PWR) "NONET_L06_P-001" (solid, pour order 163): 37.19,51.058 36.402,50.271 36.402,49.788 37.977,49.788 37.977,50.245 38.51,50.779 40.949,50.779 40.949,51.058
ILIM_LDO- on L6 (SIG/PWR) "NONET_L06_P-001" (solid, pour order 162): 40.949,52.15 40.949,53.776 40.238,53.776 40.238,52.15
-3V9 on L6 (SIG/PWR) "NONET_L06_P-001" (solid, pour order 160): 40.949,50.601 38.739,50.601 38.739,47.604 40.466,47.604 40.466,49.128 40.949,49.61 40.949,50.169
SET_LDO- on L6 (SIG/PWR) "NONET_L06_P-001" (solid, pour order 158): 43.133,51.972 43.971,51.972 44.733,52.734 46.638,52.734 46.638,51.947 44.886,51.947 44.657,51.718 43.133,51.718 43.133,51.845
NetC216_1 on L6 (SIG/PWR) "NONET_L06_P-001" (solid, pour order 159): 44.784,51.718 46.994,51.718 46.994,46.791 43.006,46.791 43.006,48.289 44.048,48.289 44.048,47.502 46.41,47.502 46.41,49.178 44.784,50.804
-3V3 on L6 (SIG/PWR) "NONET_L06_P-001" (solid, pour order 141): 43.133,50.601 43.921,50.601 45.064,49.458 45.064,48.264 46.232,48.264 46.232,47.807 44.479,47.807 44.479,48.721 43.286,49.915 43.133,49.915
GND on L6 (SIG/PWR) "GND_L06_P119" (solid, pour order 119): 19.308,8.513 19.308,7.497 20.73,6.075 20.73,8.513
NetR204_1 on L6 (SIG/PWR) "NETR204_1_L06_P107" (solid, pour order 107): 26.953,47.934 26.953,46.105 28.173,46.105 28.173,47.934 27.233,47.934
SW_BQ on L6 (SIG/PWR) "SW_BQ_L06_P113" (solid, pour order 113): 15.803,8.157 16.387,8.742 16.387,10.723 15.549,10.723 15.549,10.189 14.304,10.189 14.304,8.97 14.99,8.284 14.99,7.548 15.803,7.548
-3V9 on L6 (SIG/PWR) "-3V9_L06_P103" (solid, pour order 103): 31.297,45.953 31.297,43.844 21.95,43.844 21.95,45.953 30.103,45.953
LDO_BQ on L6 (SIG/PWR) "LDO_BQ_L06_P116" (solid, pour order 116): 16.006,4.779 16.743,4.779 16.997,4.525 17.759,4.525 17.759,3.865 16.946,3.865 16.768,3.687 16.768,2.95 16.006,2.95
BAT+ on L6 (SIG/PWR) "BAT+_L06_P115" (solid, pour order 115): 10.951,7.37 12.755,7.37 12.755,6.481 10.951,6.481
SYS on L6 (SIG/PWR) "SYS_L06_P114" (solid, pour order 114): 9.377,19.079 9.377,17.759 11.993,17.759 11.993,11.307 12.933,10.367 12.933,7.548 13.745,7.548 13.745,8.386 13.999,8.64 13.999,19.079
PMID_BQ on L6 (SIG/PWR) "PMID_BQ_L06_P112" (solid, pour order 112): 16.006,6.76 16.997,6.76 18.317,8.081 19.105,8.081 19.105,6.532 17.225,6.532 16.006,6.532
VUSB on L6 (SIG/PWR) "VUSB_L06_P111" (solid, pour order 111): 16.006,7.014 16.006,7.802 17.174,8.97 18.038,8.97 18.241,9.173 18.241,11.739 21.289,11.739 21.289,8.691 18.241,8.691 16.565,7.014 16.463,7.014
NetC221_2 on L6 (SIG/PWR) "NETC221_2_L06_P110" (solid, pour order 110): 19.74,13.923 22.839,13.923 22.839,11.942 19.74,11.942 19.74,13.669
NetC219_2 on L6 (SIG/PWR) "NETC219_2_L06_P109" (solid, pour order 109): 21.492,7.268 26.014,7.268 26.014,9.478 25.607,9.478 25.074,10.012 25.074,11.739 21.492,11.739 21.492,7.319
NetC205_1 on L6 (SIG/PWR) "NETC205_1_L06_P108" (solid, pour order 108): 31.246,46.156 31.246,48.01 29.468,48.01 29.468,46.969 28.452,46.969 28.452,46.156
NetC201_2 on L6 (SIG/PWR) "NETC201_2_L06_P106" (solid, pour order 106): 29.57,49.204 29.57,54.335 31.017,54.335 31.017,49.204 30.052,49.204
NetC201_1 on L6 (SIG/PWR) "NETC201_1_L06_P104" (solid, pour order 104): 23.677,47.096 26.623,47.096 26.623,48.137 29.316,48.137 29.316,51.236 28.35,51.236 28.35,49.001 23.677,49.001
+3V9 on L6 (SIG/PWR) "+3V9_L06_P105" (solid, pour order 105): 24.769,49.229 24.769,52.15 25.633,52.15 26.699,53.217 26.699,54.309 28.173,54.309 28.173,49.229 27.741,49.229
+3V3_ANALOG on L6 (SIG/PWR) "+3V3_ANALOG_L06_P040" (solid, pour order 40): 46.994,30.001 46.994,28.071 46.232,28.071 46.232,30.001 46.334,30.001
-3V3 on L6 (SIG/PWR) "-3V3_L06_P044" (solid, pour order 44): 48.467,41.812 48.467,39.958 49.382,39.958 49.382,41.812
+3V3_ANALOG on L6 (SIG/PWR) "+3V3_ANALOG_L06_P042" (solid, pour order 42): 43.006,37.926 42.32,37.926 42.32,36.148 43.006,36.148
-3V3 on L6 (SIG/PWR) "-3V3_L06_P041" (solid, pour order 41): 44.403,33.176 44.403,31.221 43.54,31.221 43.54,33.176
+3V3_ANALOG on L6 (SIG/PWR) "+3V3_ANALOG_L06_P039" (solid, pour order 39): 46.205,26.979 46.205,25.238 46.662,24.781 46.662,24.019 47.043,23.638 47.043,23.079 47.223,23.079 47.223,26.979
-3V3 on L6 (SIG/PWR) "-3V3_L06_P038" (solid, pour order 38): 49.128,27.03 49.128,25.226 48.67,24.769 48.67,24.007 48.315,23.651 48.315,22.712 48.112,22.712 48.112,27.03
no net on Bottom Overlay "NONET_L06_P-001" (solid): 45.54,43.935 ccw(c45.54,43.435) 45.04,43.435 45.04,43.369 ccw(c45.574,43.403) 45.54,42.869 ccw(c45.023,43.402)
no net on Bottom Overlay "NONET_L06_P-001" (solid): 5.204,23.096 ccw(c5.704,23.096) 5.704,22.596 5.771,22.596 ccw(c5.736,23.13) 6.271,23.096 ccw(c5.737,22.579)
no net on Bottom Overlay "NONET_L06_P-001" (solid): 45.823,46.012 ccw(c45.823,45.512) 45.323,45.512 45.323,45.445 ccw(c45.858,45.48) 45.823,44.945 ccw(c45.306,45.479)
no net on Bottom Overlay "NONET_L06_P-001" (solid): 25.748,41.803 ccw(c25.748,41.303) 25.248,41.303 25.248,41.236 ccw(c25.782,41.271) 25.748,40.736 ccw(c25.231,41.27)
no net on Bottom Overlay "NONET_L06_P-001" (solid): 14.534,46.483 ccw(c14.534,45.983) 14.034,45.983 14.034,45.916 ccw(c14.569,45.951) 14.534,45.416 ccw(c14.018,45.95)
no net on Bottom Overlay "NONET_L06_P-001" (solid): 15.004,13.441 ccw(c15.004,12.941) 14.504,12.941 14.504,12.874 ccw(c15.039,12.909) 15.004,12.374 ccw(c14.488,12.907)
no net on Bottom Overlay "NONET_L06_P-001" (solid): 5.626,46.909 ccw(c5.626,46.409) 5.126,46.409 5.126,46.342 ccw(c5.661,46.377) 5.626,45.842 ccw(c5.11,46.376)
no net on Bottom Overlay "NONET_L06_P-001" (solid): 38.518,22.606 ccw(c38.518,22.106) 38.019,22.106 38.019,22.039 ccw(c38.553,22.074) 38.519,21.539 ccw(c38.002,22.073)
GND on L2 (GND) "NONET_L06_P-001" (solid, pour order 206): 3,54.754 ccw(c3,51.754) 0,51.754 0,3 ccw(c3,3) 3,0 51.754,0 ccw(c51.754,3) 54.754,3 54.754,51.754 ccw(c51.754,51.754) 51.754,54.754
GND on L4 (PWR) "NONET_L06_P-001" (solid, pour order 211): 27.944,0.004 27.944,54.754 33.659,54.754 33.659,0.004
+3V3_DIG on L4 (PWR) "+3V3_DIG_L04_P123" (solid, pour order 123): 3,0 20.908,0 27.944,0 27.944,54.754 3,54.754 ccw(c3,51.754) 0,51.754 0,3 ccw(c3,3)
-3V3 on L4 (PWR) "NONET_L06_P-001" (solid, pour order 173): 44.467,31.749 cw(c44.771,31.749) 44.771,32.053 45.76,32.053 cw(c45.762,31.749) 46.067,31.749 46.067,29.412 cw(c45.711,29.412) 45.711,29.056 44.841,29.056 cw(c44.841,29.43) 44.467,29.43 44.467,29.432
-3V3 on L4 (PWR) "NONET_L06_P-001" (solid, pour order 172): 40.623,39.666 cw(c40.927,39.666) 40.927,39.971 41.916,39.971 cw(c41.918,39.666) 42.223,39.666 42.223,37.329 cw(c41.867,37.329) 41.867,36.973 40.997,36.973 cw(c40.997,37.348) 40.623,37.348 40.623,37.349
-3V3 on L4 (PWR) "NONET_L06_P-001" (solid, pour order 171): 49.432,40.517 cw(c49.737,40.517) 49.737,40.822 50.726,40.822 cw(c50.728,40.517) 51.033,40.517 51.033,38.18 cw(c50.677,38.18) 50.677,37.825 49.807,37.825 cw(c49.807,38.199) 49.432,38.199 49.432,38.2
-3V3 on L4 (PWR) "-3V3_L04_P102" (solid, pour order 102): 46.435,22.839 48.924,22.839 48.924,21.061 46.435,21.061 46.435,22.686
GND on L5 (GND) "NONET_L06_P-001" (solid, pour order 207): 3,54.754 ccw(c3,51.754) 0,51.754 0,3 ccw(c3,3) 3,0 51.754,0 ccw(c51.754,3) 54.754,3 54.754,51.754 ccw(c51.754,51.754) 51.754,54.754
GND on L3 (SIG) "NONET_L06_P-001" (solid, pour order 208): 3,54.754 ccw(c3,51.754) 0,51.754 0,3 ccw(c3,3) 3,0 51.754,0 ccw(c51.754,3) 54.754,3 54.754,51.754 ccw(c51.754,51.754) 51.754,54.754

## Other copper
L1 (SIG/PWR):
  pour cut-out: 6.166,17.501 7.726,17.501 7.726,17.076 6.166,17.076
  pour cut-out: 34.2,43.964 35.158,43.964 35.259,44.066 35.259,45.394 34.192,45.394
  pour cut-out: 13.771,20.375 13.009,21.137 8.513,21.137 6.202,18.825 6.176,18.825 6.176,18.571 6.557,18.19 8.132,19.765 13.669,19.765
  pour cut-out: 41.838,42.193 47.807,42.193 48.442,41.558 48.442,41.101 41.838,41.101
  pour cut-out: 12.044,12.044 16.412,16.412 17.733,16.412 12.958,11.637 12.602,11.637
  pour cut-out: 19.384,23.321 17.479,23.321 16.006,24.794 15.904,24.794 15.498,25.201 15.422,25.201 14.838,24.617 16.971,22.483 19.613,22.483
  pour cut-out: 9.021,23.296 14.863,23.296 16.209,21.95 17.911,21.95 17.911,21.238 15.549,21.238 14.152,22.635 9.046,22.635 9.021,22.661
  pour cut-out: 41.431,42.879 41.914,42.397 41.914,41.279 39.45,41.279 39.45,42.143 40.187,42.879
  pour cut-out: 18.902,40.415 18.902,40.085 19.41,40.085 19.41,38.764 19.841,39.196 19.841,40.415
  pour cut-out: 17.073,42.651 16.539,42.651 16.539,38.155 17.073,38.155 17.073,41.762
  pour cut-out: 10.469,36.834 10.469,36.402 10.57,36.301 12.247,37.977 12.628,37.977 12.729,38.079 12.729,38.434 12.069,38.434 10.977,37.342
  pour cut-out: 19.13,1.553 19.13,0 16.971,0 16.971,1.553 18.952,1.553
  pour cut-out: 8.792,21.467 6.1,18.775 6.1,19.562 8.792,22.254
  pour cut-out: 4.246,36.555 4.246,34.218 4.576,34.218 4.576,36.555
  pour cut-out: 27.588,44.911 29.239,44.911 30.001,45.673 30.001,46.08 27.588,46.08
L3 (SIG):
  pour cut-out: 23.956,7.294 23.956,6.329 27.03,6.329 27.03,7.599 23.931,7.599
  pour cut-out: 26.877,6.379 26.877,4.982 28.681,4.982 28.681,6.379 27.944,6.379
  pour cut-out: 23.778,6.379 23.778,5.008 26.014,5.008 26.014,6.278 24.566,6.278
  pour cut-out: 24.185,4.932 24.185,3.814 25.074,2.925 27.614,2.925 28.477,3.789 28.477,4.932 24.896,4.932
  pour cut-out: 28.122,23.067 27.868,23.321 27.868,37.774 30.027,39.933 30.027,41.635 30.916,41.635 30.916,36.275 28.833,34.192 28.833,26.115 31.322,23.626 31.322,23.093 28.173,23.093
L4 (PWR):
  pour cut-out: 31.246,33.684 31.246,32.211 32.262,31.195 32.262,28.427 33.761,26.928 33.761,33.684 32.364,33.684
  pour cut-out: 25.429,4.119 25.429,3.611 28.452,3.611 28.452,20.019 25.48,20.019 25.48,6.049
L6 (SIG/PWR):
  pour cut-out: 15.777,32.668 15.777,31.602 18.952,31.602 18.952,32.668 17.225,32.668 16.717,33.176 16.412,33.176 15.981,32.745
  pour cut-out: 38.663,3.204 38.663,4.195 40.009,4.195 40.009,3.204 39.526,3.204
  pour cut-out: 18.978,33.583 18.546,34.015 18.14,34.015 17.682,33.557 17.352,33.557 16.235,34.675 15.854,34.675 15.854,32.668 18.978,32.668
  pour cut-out: 44.657,51.566 44.657,50.931 44.505,50.931 44.225,51.21 43.87,51.21 43.87,51.566 44.327,51.566
  pour cut-out: 24.718,52.252 24.236,52.252 24.236,50.525 24.718,50.525 24.718,52.099
  pour cut-out: 20.781,54.754 20.781,52.734 18.8,52.734 17.911,53.623 16.641,53.623 15.904,54.36 15.904,54.754
  pour cut-out: 2.696,27.004 2.696,21.188 1.579,21.188 1.579,27.004 2.112,27.004
  pour cut-out: 26.522,54.754 26.522,54.436 28.325,54.436 28.325,51.236 29.468,51.236 29.468,54.411 31.195,54.411 31.195,54.754
  pour cut-out: 19.13,4.246 20.4,4.246 20.4,5.44 19.13,5.44 19.13,4.678
  pour cut-out: 17.047,6.024 17.047,4.957 18.902,4.957 18.902,6.024 17.632,6.024

## Silkscreen, mask and mechanical layers (free items; w line width, h text height)
Top Overlay:
  drawing of 90 lines, arcs and shapes, not listed
  text "3V3 DIGITAL" at 7.781,48.612 h0.47
  text "GND" at 2.321,46.911 h0.5
  text "3V3DAC" at 35.215,46.733 h0.5
  text "3V3 DAC" at 45.179,46.478 h0.47
  text "3V9" at 21.551,43.6 h0.47 r90
  text "GND" at 40.599,43.431 h0.5
  text "+3V3D" at 5.506,41.653 h0.5
  text "GND" at 21.879,41.653 h0.5
  text "DAC" at 30.503,40.027 h0.47
  text "LED DRIVER" at 8.12,39.964 h0.47
  text "DIGITAL AUDIO PLAYER" at 38.325,39.536 h0.83
  text "Alexander Loker" at 40.519,38.241 h0.83
  text "D2" at 28.024,37.411 h0.5
  text "D1" at 29.633,37.411 h0.5
  text "GND" at 18.145,36.675 h0.5
  text "TX/SDCLK" at 19.619,34.694 h0.5
  text "+LED" at 14.661,34.313 h0.5
  text "RX/DAT0" at 18.701,31.906 h0.5
  text "MCLK" at 28.255,30.376 h0.5
  text "MCU" at 26.171,29.282 h0.47
  text "+3V3A" at 46.794,28.902 h0.5
  text "GND" at 50.428,26.286 h0.5
  text "3V3 ANALOG" at 45.045,26.184 h0.47
  text "MOSI" at 9.678,22.4 h0.5
  text "D/CX" at 10.35,21.054 h0.5
  text "SCL_SPI" at 7.798,19.747 h0.5
  text "SCL" at 23.157,17.396 h0.5
  text "GND" at 9.814,16.685 h0.5
  text "CHIP_PU" at 16.04,15.826 h0.5
  text "UPLOAD" at 24.971,14.5 h0.47
  text "BOOT" at 33.176,13.815 h0.5
  text "SDA" at 14.133,12.189 h0.5
  text "USB-C" at 31.156,8.15 h0.47
  text "GND" at 18.653,7.998 h0.5
Bottom Overlay:
  drawing of 95 lines, arcs and shapes, not listed
  text "GND" at 48.233,49.273 h0.5
  text "SD-CARD" at 9.161,46.173 h0.47
  text "VOLUME +/-" at 19.954,45.716 h0.47
  text "-3V3" at 48.027,45.259 h0.47
  text "-3V9" at 28.832,43.685 h0.5
  text "ANALOG AUDIO STAGE" at 53.727,43.202 h0.47
  text "-3V3" at 43.387,42.72 h0.5
  text "GND" at 25.119,42.568 h0.5
  text "-3V9" at 28.037,41.068 h0.47
  text "POWER" at 5.955,25.953 h0.47 r90
  text "OUTPUT OP-AMP" at 44.687,21.866 h0.47
  text "SYS" at 11.147,19.123 h0.5
  text "GND" at 8.787,17.142 h0.5
  text "CHARGER" at 18.595,12.696 h0.47
  text "VUSB" at 19.441,11.199 h0.5
  text "SELECT" at 42.463,10.487 h0.5
  text "BAT" at 6.608,9.573 h0.5
  text "GND" at 3.58,7.058 h0.5
  text "GND" at 37.387,6.779 h0.5
Mechanical 1:
  the board outline again, w0.254